# Altium PCB starfish.PcbDoc
Units mil, origin at the board's own origin, x right, y up, seen from the top; angles counter-clockwise.
Board outline 1535.43 x 1456.69 mil, 4 copper layers (Top, Route2, Route15, Bottom), stack 65.356 mil thick; 62 components, 72 nets, 276 pads, 141 vias.
Unrouted connection lines stored in the file: 10.
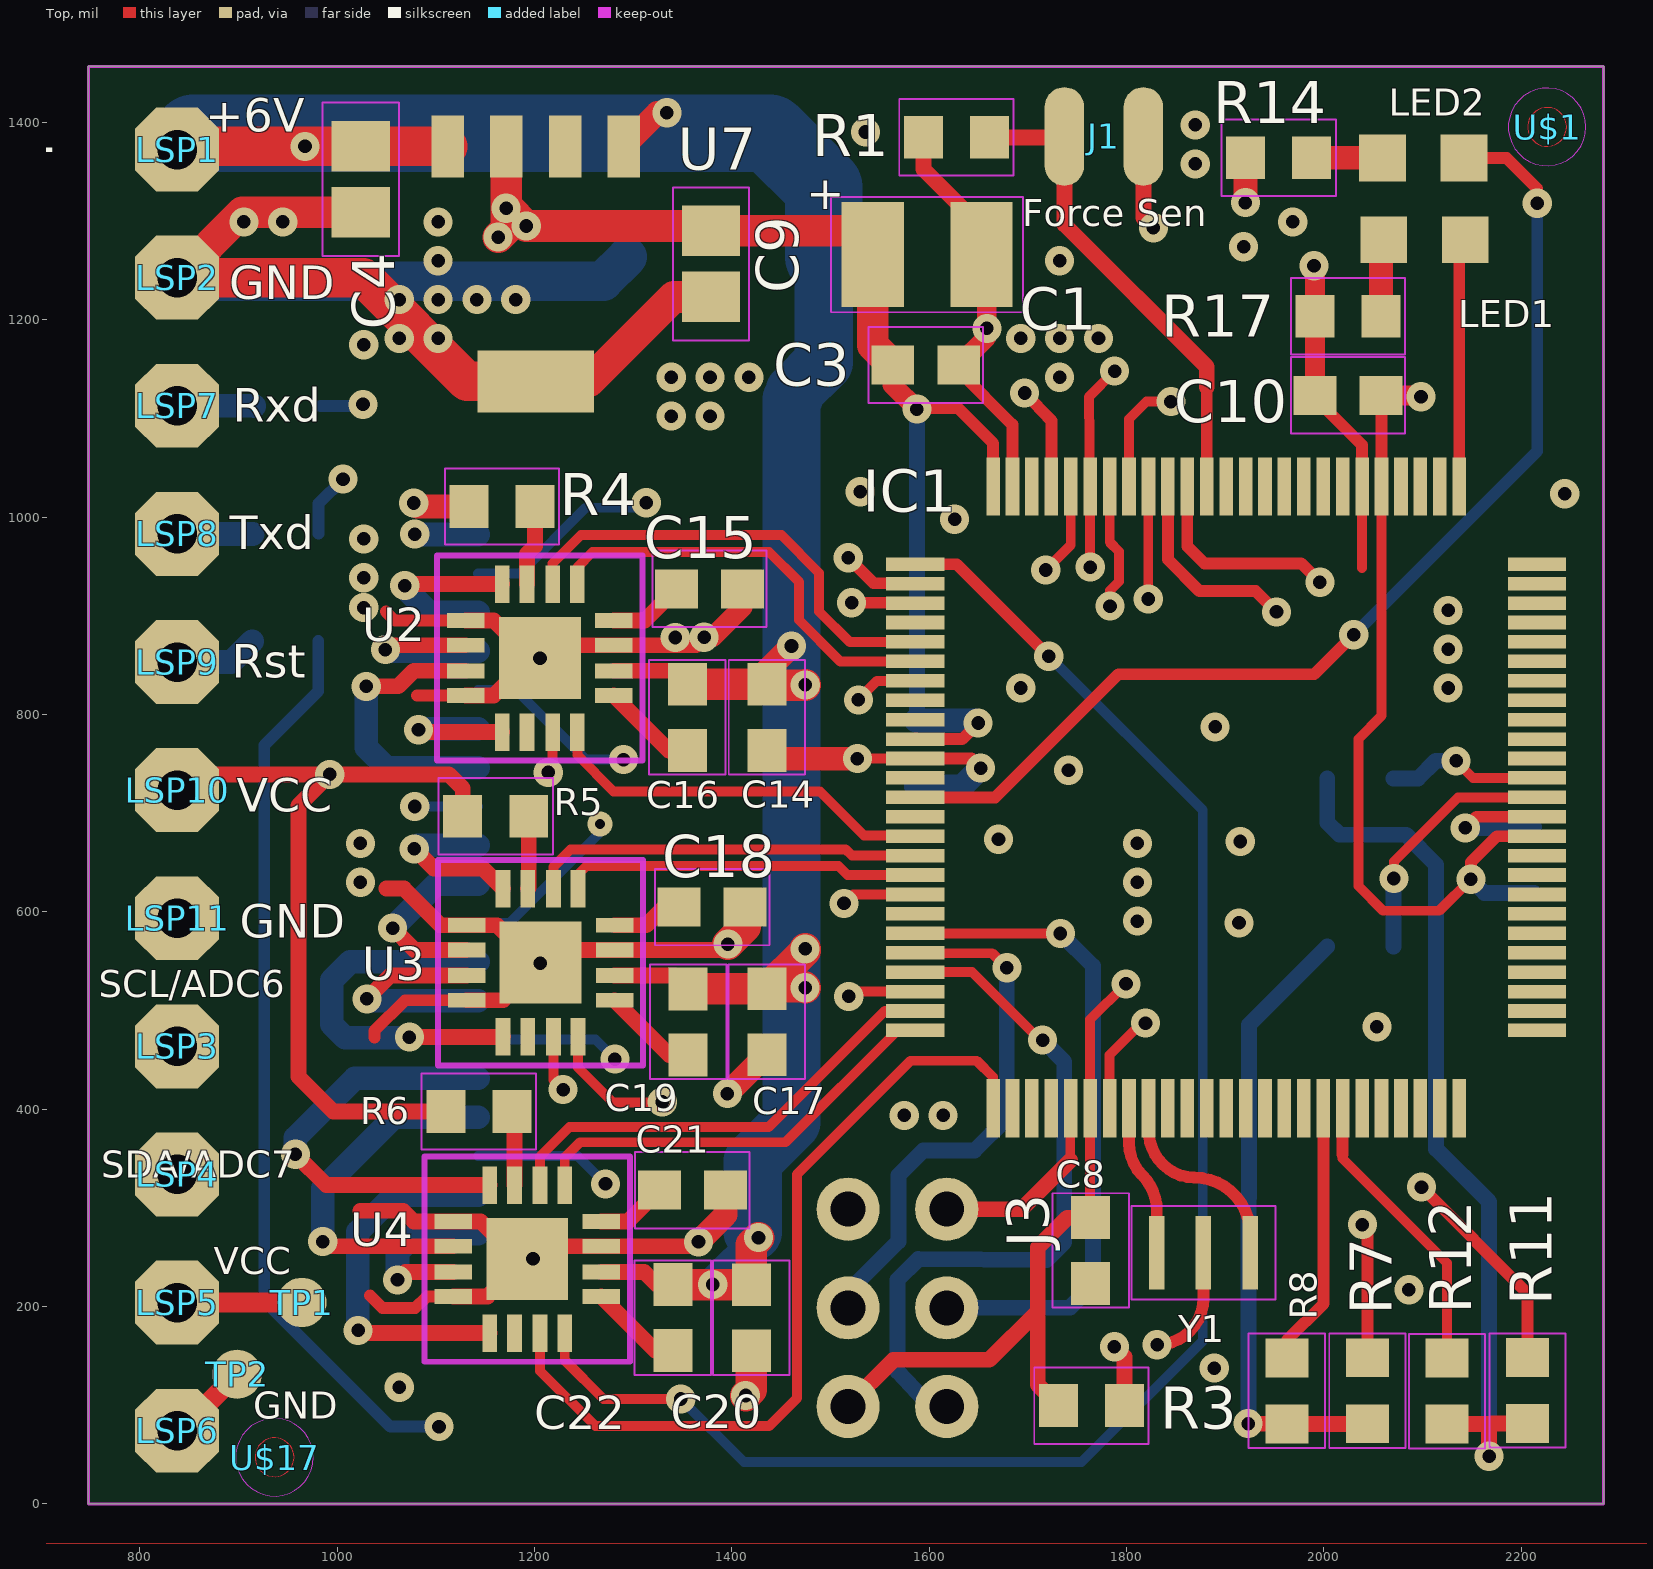
[diagram p0: Top view]
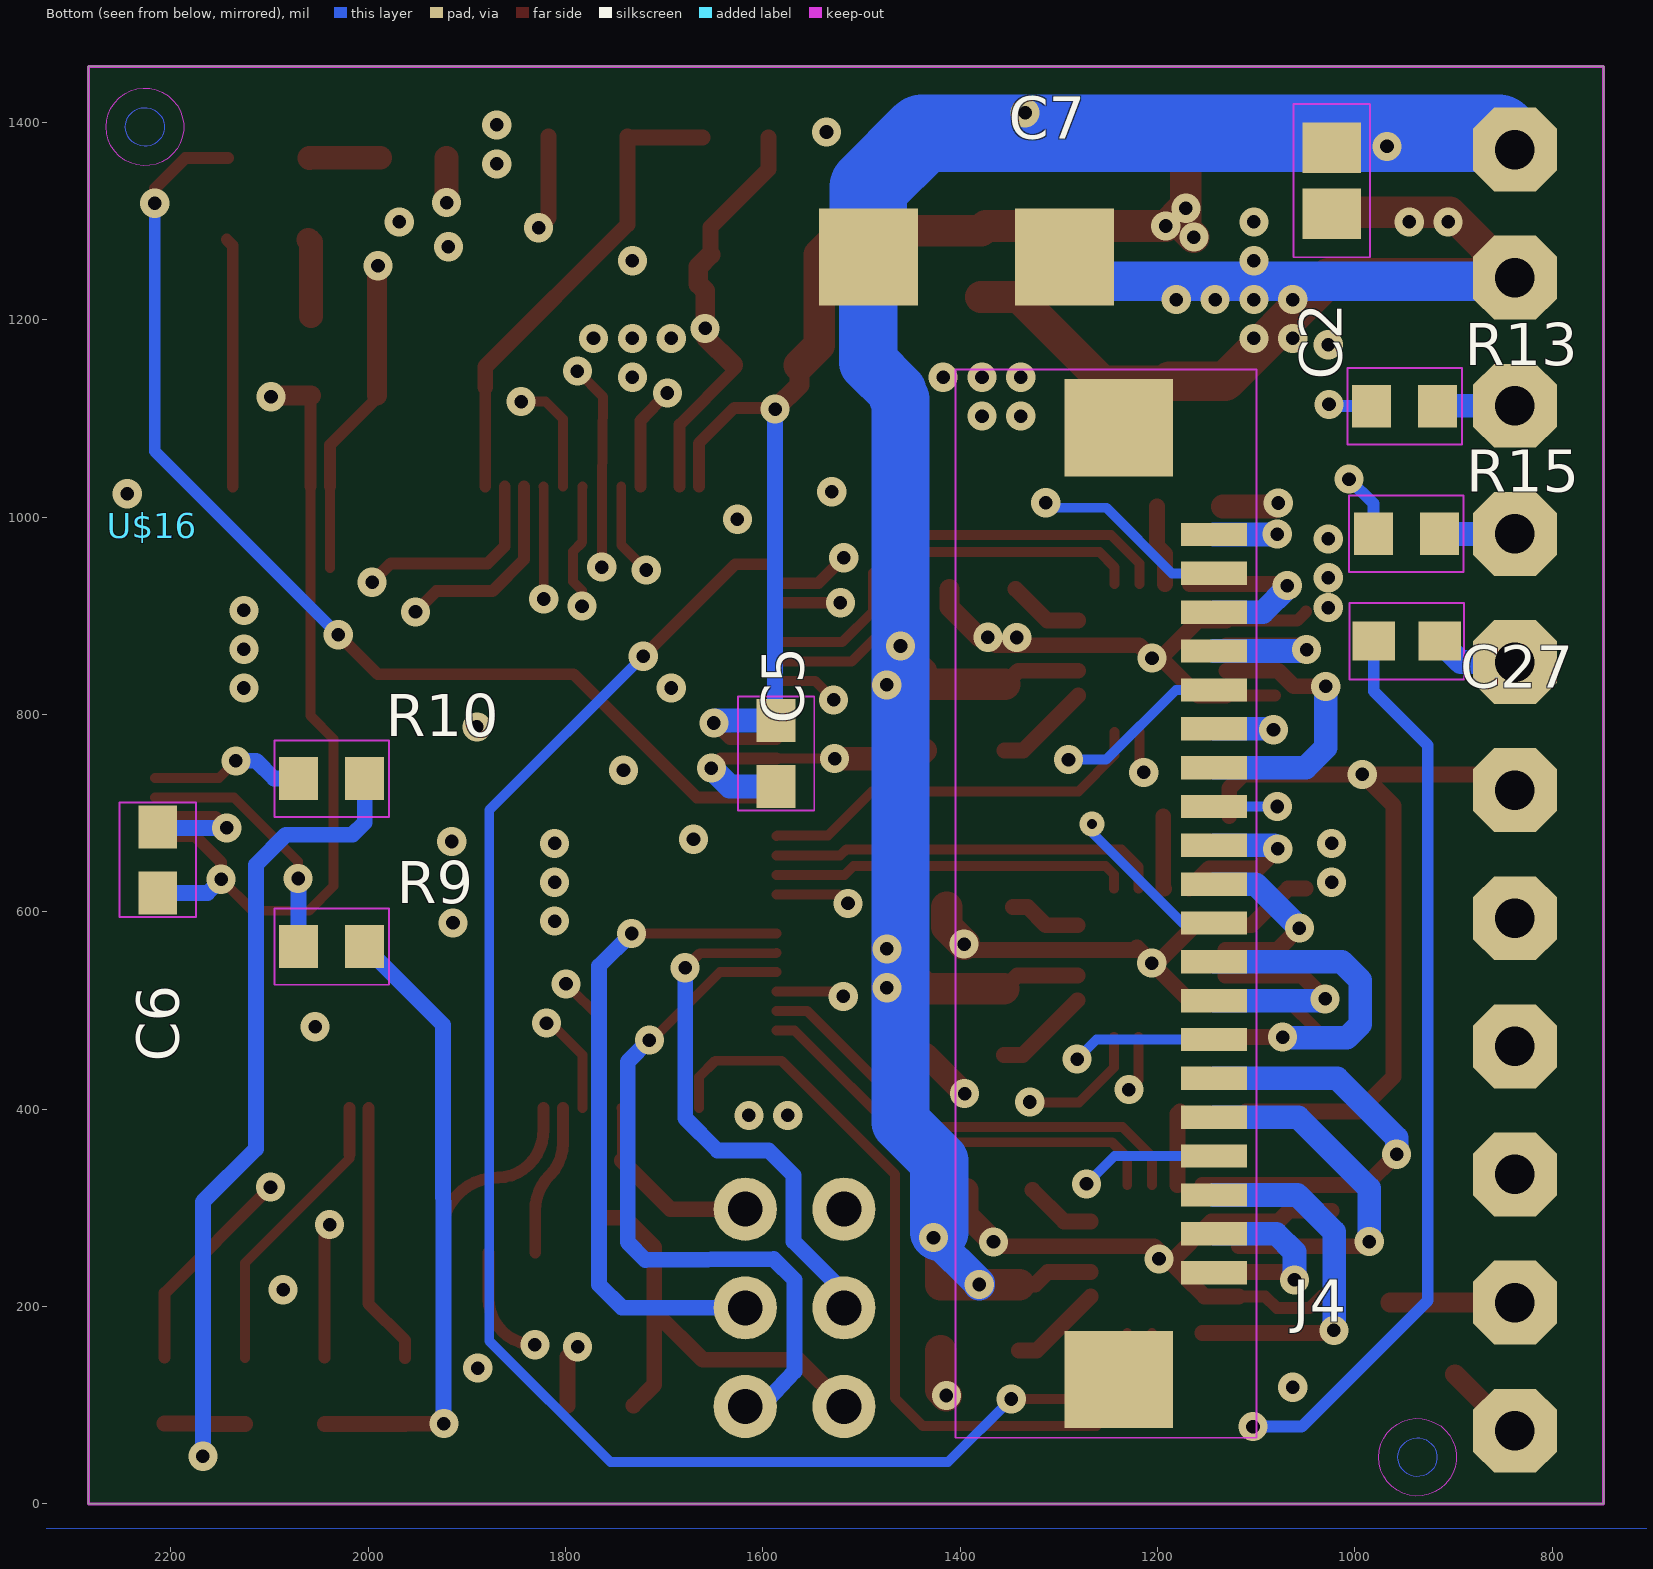
[diagram p1: Bottom view, seen from below]
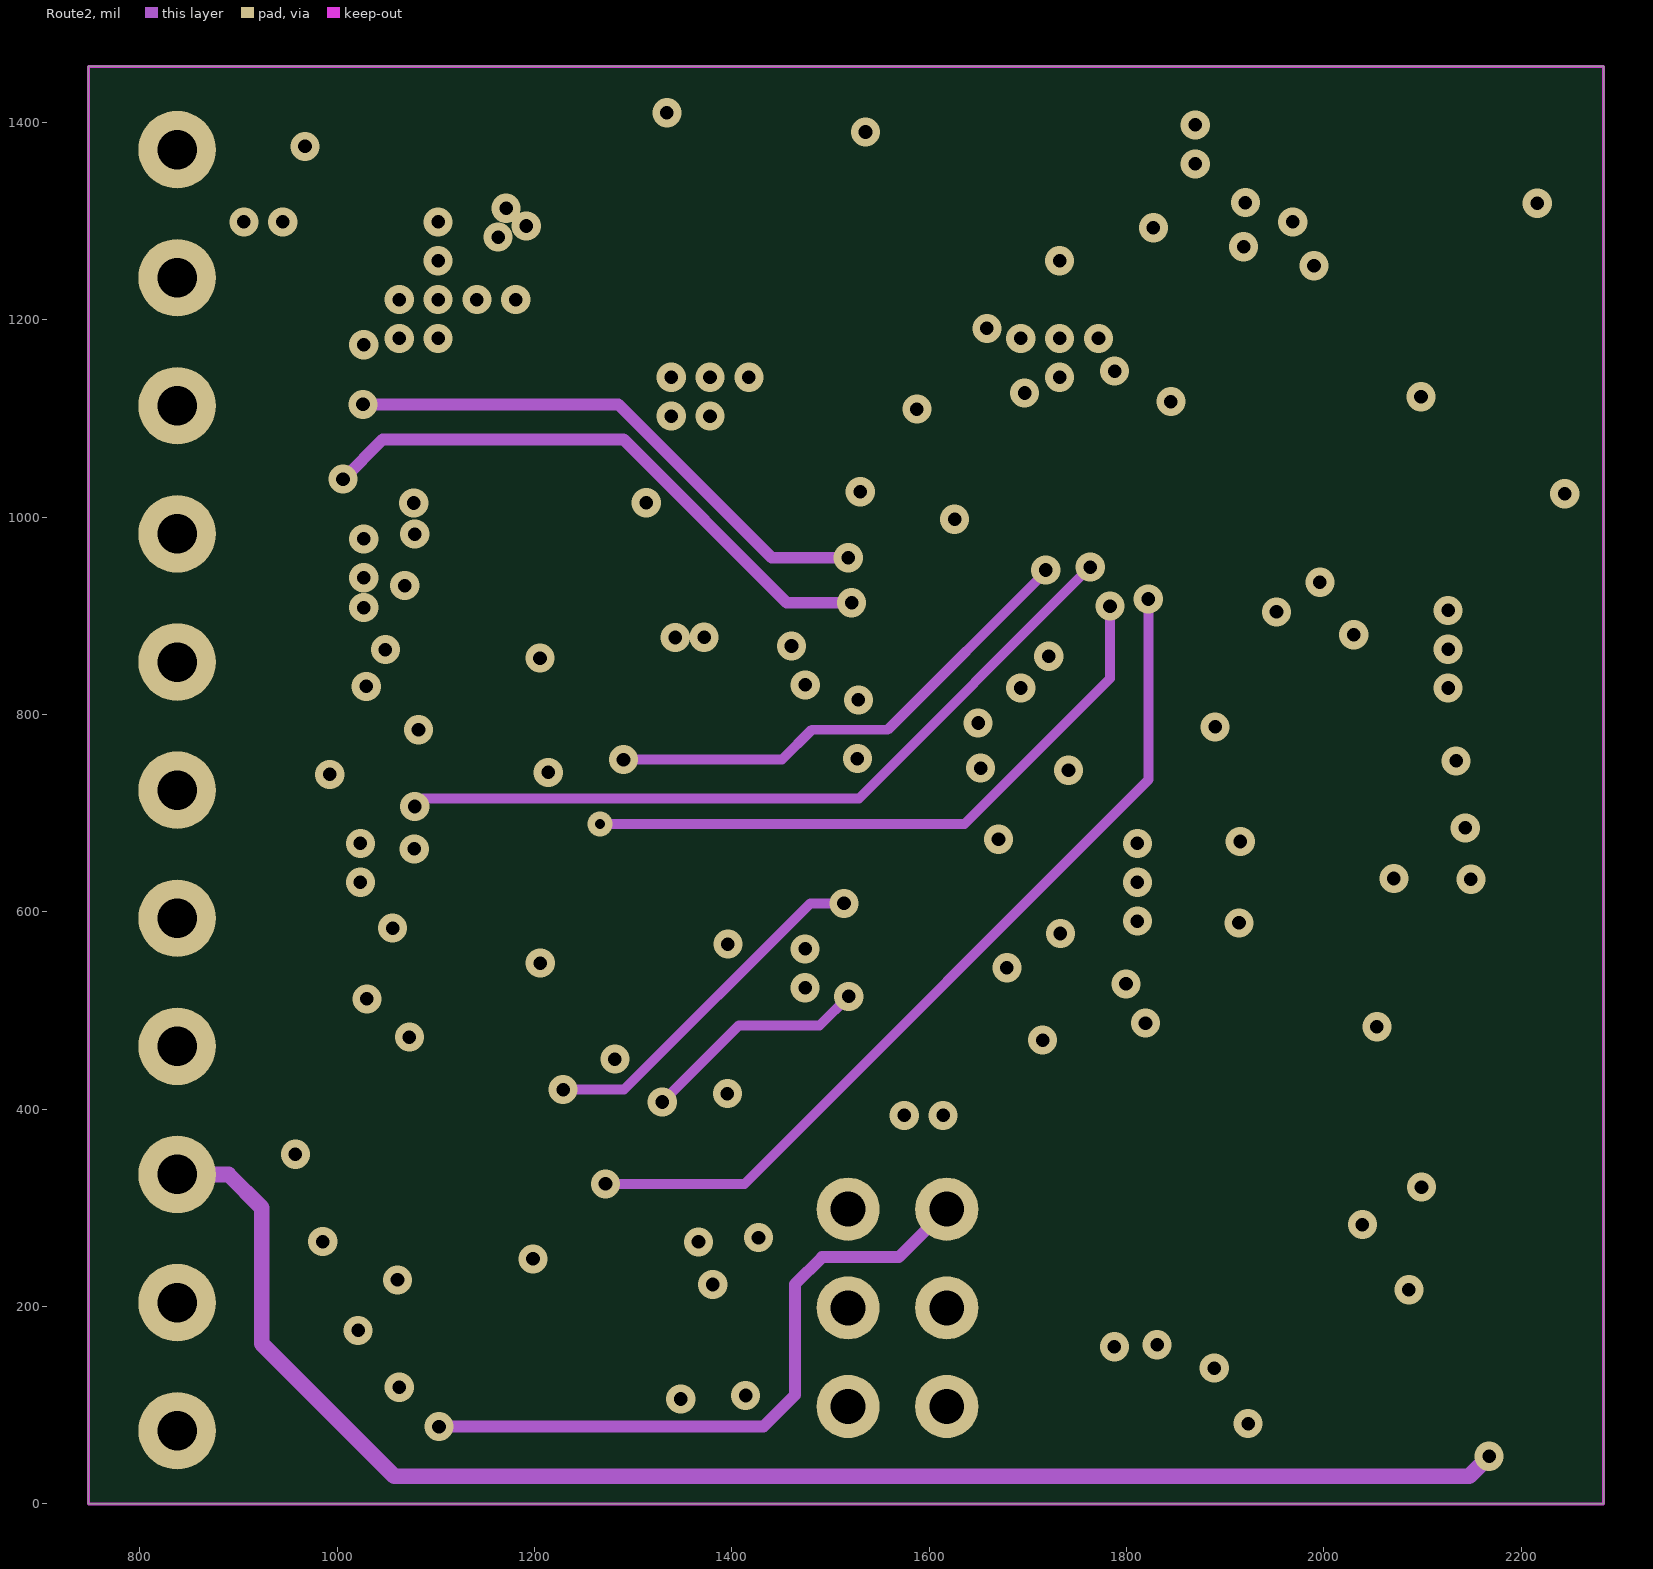
[diagram p2: Route2]
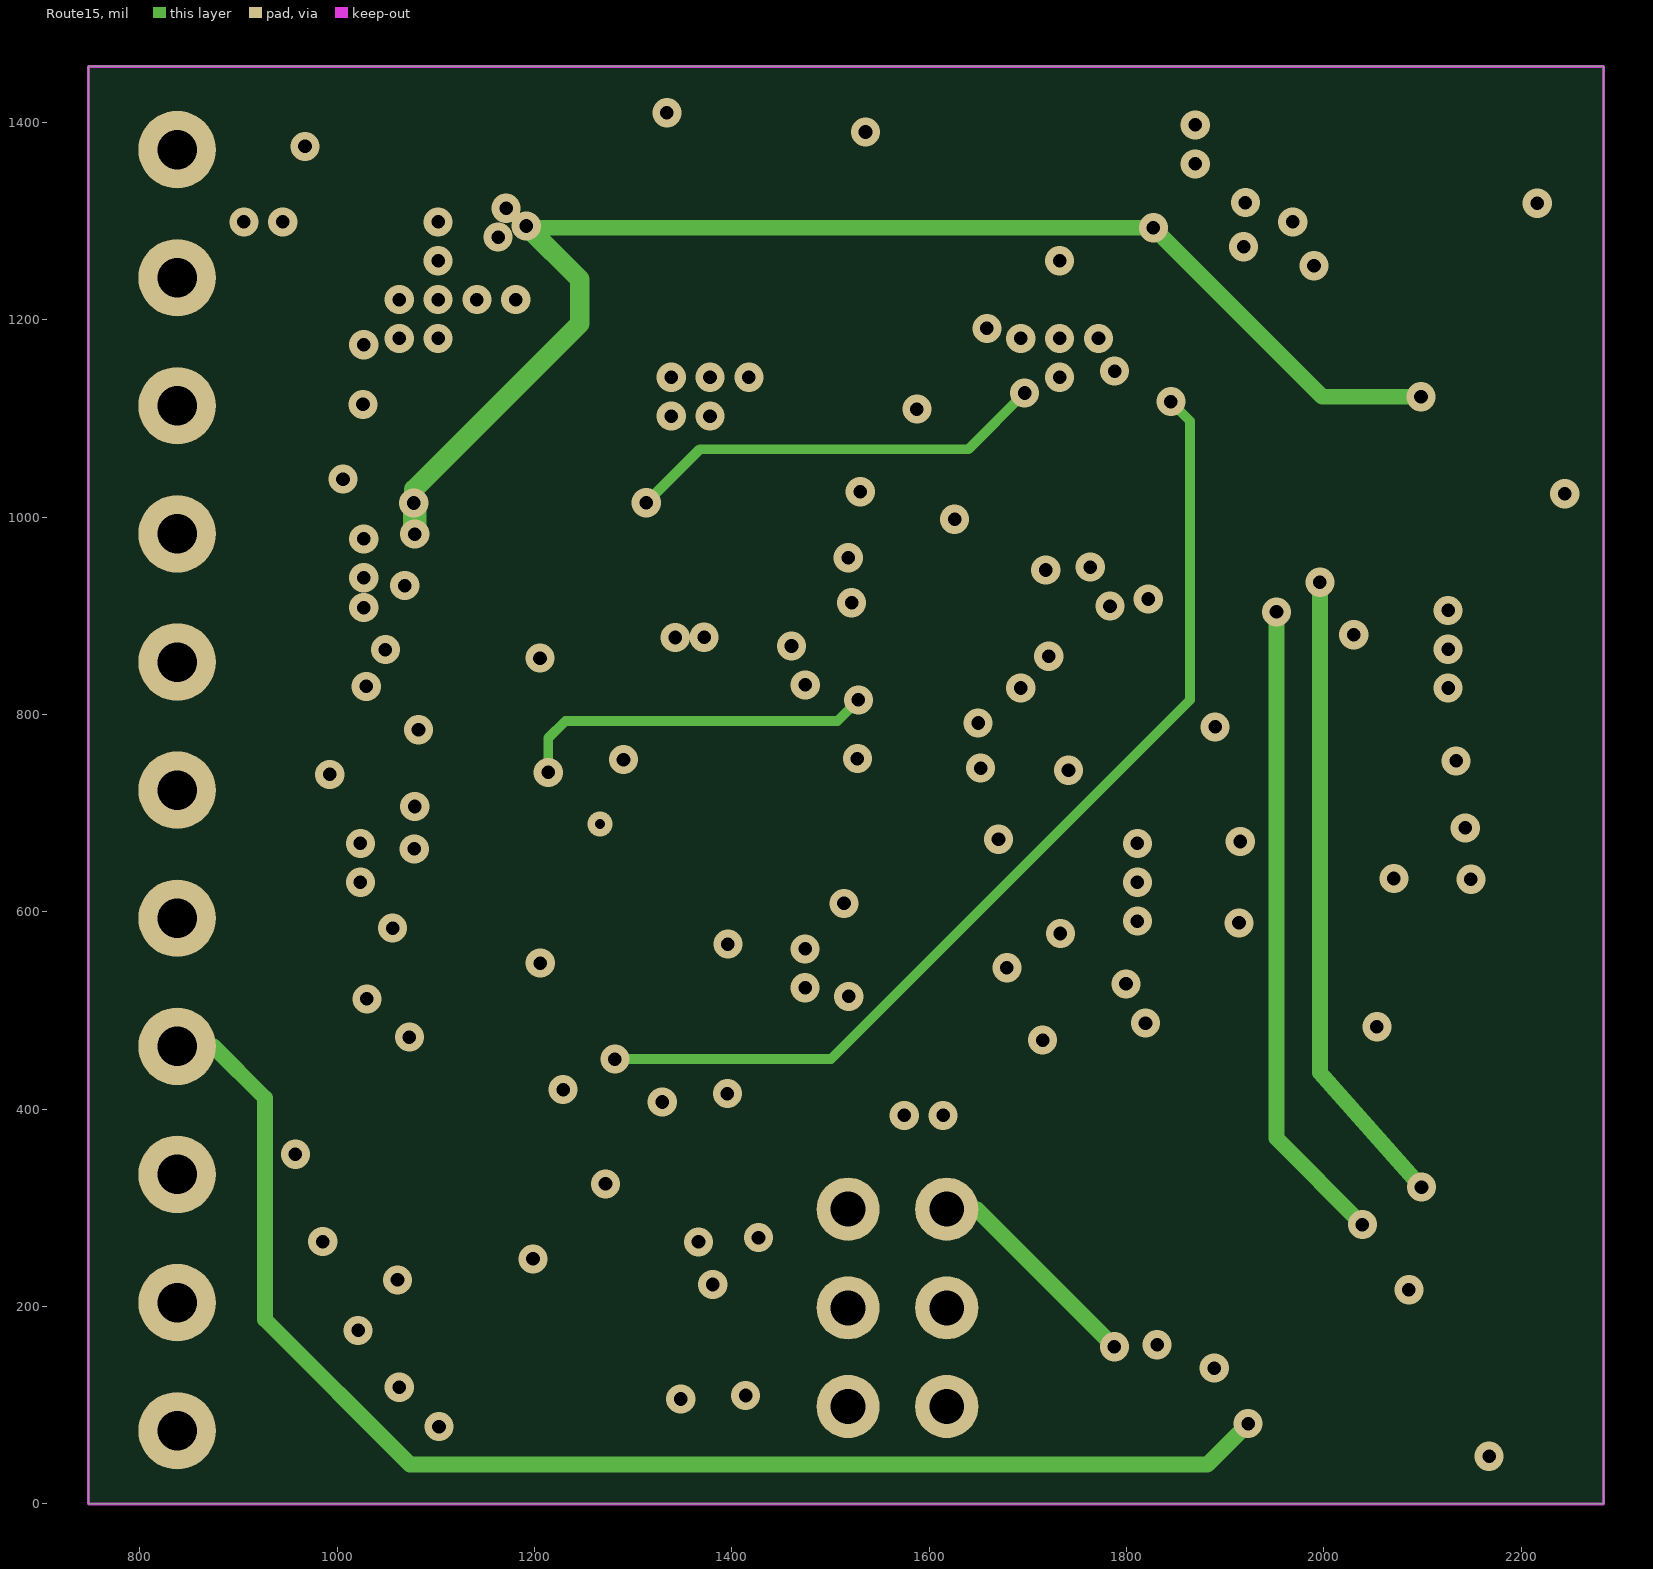
[diagram p3: Route15]

## Layer stack, top to bottom
Top Solder: solder mask 0.4, Solder Resist, Dk 3.5
Top: signal copper 1.378
Dielectric 1: core 7.874, FR-4, Dk 4.8
Route2: signal copper 1.378
Dielectric3: core 39.3701, FR-4, Dk 4.8
Route15: signal copper 1.378
Dielectric2: dielectric 12.6, FR-4, Dk 4.8
Bottom: signal copper 1.378
Bottom Solder: solder mask 0.4, Solder Resist, Dk 3.5

## Board outline
748.03,1456.69 748.03,0 2283.46,0 2283.46,1456.69

## Design rules (kind name [scope] priority, off if disabled: settings)
BoardOutlineClearance mdCopperDimension [All] p1: gap=10 ignorepadtopadclearanceinfootprint=FALSE except(0: Arc-SplitContinuation Track-SplitContinuation SMDPad-SplitContinuation THPad-SplitContinuation Via-SplitContinuation Fill-SplitContinuation Poly-SplitContinuation Region-SplitContinuation Text-SplitContinuation; 11.81: Poly-OutlineEdge Poly-CavityEdge Poly-CutoutEdge Poly-SplitBarrior)
Clearance "Clearance (Same Net)" [All] p1: gap=4.92 ignorepadtopadclearanceinfootprint=FALSE
Clearance [All] p2: gap=4.92 ignorepadtopadclearanceinfootprint=FALSE
HoleSize [All] p1: absolutevalues=TRUE maxlimit=100000 minlimit=7.87 maxpercent=80.000 minpercent=20.000
HoleToHoleClearance mdDrill [All] p1: gap=7.87 allowstackedmicrovias=TRUE
MinimumSolderMaskSliver [All] p1 off: minsoldermaskwidth=10
PasteMaskExpansion Expansion_SMDPaste_OFF [InPadClass('SMDPaste_OFF')] p1: expansion=0
PasteMaskExpansion mlMinCreamFrame [All] p2: expansion=0
PolygonConnect PolygonConnect_For_PolygonThermal_ON_Width100000_Gap78740 [InPolygonClass('PolygonThermal_ON_Width100000_Gap78740') vs Not IsVia] p1: connectstyle=Relief reliefconductorwidth=10 reliefentries=4 polygonreliefangle="90 Angle" airgapwidth=7.87
PolygonConnect PolygonConnect_For_PolygonThermal_ON_Width160000_Gap78740 [InPolygonClass('PolygonThermal_ON_Width160000_Gap78740') vs Not IsVia] p2: connectstyle=Relief reliefconductorwidth=16 reliefentries=4 polygonreliefangle="90 Angle" airgapwidth=7.87
PolygonConnect PolygonConnect_For_PolygonThermal_ON_Width240000_Gap78740 [InPolygonClass('PolygonThermal_ON_Width240000_Gap78740') vs Not IsVia] p3: connectstyle=Relief reliefconductorwidth=24 reliefentries=4 polygonreliefangle="90 Angle" airgapwidth=7.87
PolygonConnect ThermalVias [IsVia] p4: connectstyle=Direct reliefconductorwidth=10 reliefentries=4 polygonreliefangle="90 Angle" airgapwidth=10
PolygonConnect [All] p5: connectstyle=Relief reliefconductorwidth=10 reliefentries=4 polygonreliefangle="90 Angle" airgapwidth=10
RoutingVias [All] p1: holewidth=7.87 width=17.71 viastyle="Through Hole" minholewidth=7.87 minwidth=17.71 maxholewidth=100 maxwidth=100
SolderMaskExpansion mlMinStopFrame [All] p1: expansion=2.95 istentingtop=FALSE
Width [All] p1: maxlimit=10 minlimit=4.92 preferedwidth=4.92
26 further rules are at their usual default settings.

## Classes and differential pairs
polygon class PolygonThermal_ON_Width100000_Gap78740: Polygon_1_Net_GND Polygon_2_Net_GND
polygon class PolygonThermal_ON_Width160000_Gap78740: Polygon_1_Net_VCC
polygon class PolygonThermal_ON_Width240000_Gap78740: Polygon_3_Net_GND
pad class SMDPaste_OFF: J1-P$1 J1-P$2 TP1-TP TP2-TP

## Components (designator, comment, footprint, x,y, rotation, side; value= is the part's Value field where it differs from the comment)
C1 "100nF" C1210 1597.91,1265.99 r0 top
C2 "10uF" C0805 1023.59,1341.03 r270 bottom
C3 "100nF" C0603 1596.45,1154.1 r0 top
C4 "1uF" C0805 1024.07,1342.28 r270 top
C5 "100nF" C0603 1586.62,760.42 r270 bottom
C6 "100nF" C0603 2213.26,652.57 r90 bottom
C7 "47u/16V Tantlum" C/6032-28R 1393.7,1263.78 r0 bottom
C8 "100nF" C0603 1763.63,256.77 r270 top
C9 "1uF" C0805 1378.95,1256.53 r270 top
C10 "100nF" C0603 2024.49,1123.31 r180 top
C14 "100nF" C0603 1435.63,797.01 r270 top
C15 "2.2uF" C0603 1377.4,927.24 r0 top
C16 "10nF" C0603 1354.98,797.01 r270 top
C17 "100nF" C0603 1435.54,488.51 r270 top
C18 "2.2uF" C0603 1379.99,604.79 r0 top
C19 "10nF" C0603 1355.7,488.41 r270 top
C20 "100nF" C0603 1419.88,188.53 r270 top
C21 "2.2uF" C0603 1360.11,317.97 r0 top
C22 "10nF" C0603 1340.29,188.78 r270 top
C27 "100nF" C0603 947.5,874.27 r0 bottom
IC1 "ATMEGA2560-16AU" TQFP100 1901,716 r0 top
J1 "" SOLDER_PAD_2 1777.13,1385.77 r0 top
J3 "" AVRISP 1567.85,198.62 r180 top
J4 "FFC3B07-20-T" GCT_FFC3B07-20-T 1239.33,608.33 r270 bottom
LED1 "" CHIPLED_0805 2101.9,1281.18 r90 top
LED2 "" CHIPLED_0805 2100.76,1363.88 r90 top
LSP1 "LSP10" LSP10 837.85,1372.46 r0 top
LSP2 "LSP10" LSP10 837.85,1242.63 r0 top
LSP3 "LSP10" LSP10 837.85,463.62 r0 top
LSP4 "LSP10" LSP10 837.85,333.79 r0 top
LSP5 "LSP10" LSP10 837.85,203.95 r0 top
LSP6 "LSP10" LSP10 837.85,74.12 r0 top
LSP7 "LSP10" LSP10 837.85,1112.79 r0 top
LSP8 "LSP10" LSP10 837.85,982.96 r0 top
LSP9 "LSP10" LSP10 837.85,853.13 r0 top
LSP10 "LSP10" LSP10 837.85,723.29 r0 top
LSP11 "LSP10" LSP10 837.85,593.46 r0 top
R1 "3k3" R0603 1627.71,1384.83 r0 top
R3 "10K" R0603 1764.51,99.57 r180 top
R4 "10K" R0603 1167.11,1010.74 r0 top
R5 "10K" R0603 1160.71,696.77 r0 top
R6 "10K" R0603 1143.69,397.62 r0 top
R7 "10K" R0603 2044.18,114.65 r270 top
R8 "0R" R0603 1962.58,114.51 r270 top
R9 "DNF" R0603 2037,564.76 r180 bottom
R10 "DNF" R0603 2037,735 r180 bottom
R11 "10K" R0603 2206.36,114.87 r270 top
R12 "0R" R0603 2124.77,114.23 r270 top
R13 "1K" R0603 949.62,1112.45 r180 bottom
R14 "1K" R0603 1954.14,1364.16 r0 top
R15 "1K" R0603 947.86,983.14 r180 bottom
R17 "1K" R0603 2024.49,1203.5 r0 top
TP1 "vcc" B1,27 964.25,204.03 r0 top
TP2 "gnd" B1,27 898.62,131.3 r0 top
U2 "DRV8833RTYT" QFN65P400X400X80-17N 1205.46,857.18 r0 top
U3 "DRV8833RTYT" QFN65P400X400X80-17N 1206.21,548.42 r0 top
U4 "DRV8833RTYT" QFN65P400X400X80-17N 1192.71,248.04 r0 top
U7 "LP38692MP-5.0" SOT150P696X180-5N 1201.31,1256.53 r270 top
U$1 "" CIRCLE-1MM-2R 2226.26,1395.39 r0 top
U$16 "" ADSTRUM_LOGO 2218.87,991.61 r180 bottom
U$17 "" CIRCLE-1MM-2R 936.64,47.26 r0 top
Y1 "CSTNE16M0VH3C000R0" OSC_CSTNE16M0VH3C000R0 1877.98,254.55 r180 top

## Footprints (in the part's own frame and the unit in brackets; to place one, negate y for a bottom-side part, rotate by r counter-clockwise, add the part's x,y. Pads: shape width x height; smd on the part's side, far side on the other; paste and mask are expansions set on the pad)
ADSTRUM_LOGO [mil] "ADSTRUM_LOGO"
AVRISP [mil] "AVRISP"
  round 64 hole 35.43: 1(-50,100) 2(50,100) 3(-50,0) 4(50,0) 5(-50,-100) 6(50,-100)
  body extent -82,-132 82,132, height 50
B1,27 [mil] "B1,27"
  rrect100% 50x50 smd paste+0: TP(0,0)
  body extent -25,-25 25,25, height 50
C0603 [mm] "C0603"
  rect 1.1x1 smd: 1(-0.85,0) 2(0.85,0)
  Top keep-out lines w0.051: -1.473,-0.983 -1.473,0.983 1.473,0.983 1.473,-0.983 -1.473,-0.983
  body extent -1.5,-1.01 1.5,1.01, height 3.81
C0805 [mil] "C0805"
  rect 51.18x59.06 smd: 1(-33.46,0) 2(33.46,0)
  Top keep-out lines w2: 77.68,38.7 77.68,-38.7 -77.68,-38.7 -77.68,38.7 77.68,38.7
  body extent -79,-40 79,40, height 150
C1210 [mil] "C1210"
  rect 62.99x106.3 smd: 1(-55.12,0) 2(55.12,0)
  Top keep-out lines w2: -97.36,-58.39 -97.36,58.39 97.36,58.39 97.36,-58.39 -97.36,-58.39
  body extent -98,-59 98,59, height 150
C/6032-28R [mm] "C/6032-28R"
  rect 2.55x2.5 smd: +(2.525,0) -(-2.525,0)
  body extent -3.8,-1.25 3.8,1.25, height 1.27
CHIPLED_0805 [mil] "CHIPLED_0805"
  rect 47.24x47.24 smd: A(0,-41.34) C(0,41.34)
  body extent -25,-65 25,65, height 150
CIRCLE-1MM-2R [mil] "CIRCLE-1MM-2R"
  Top circle w0: c0,0 r19.69
  Top keep-out circle w0: c0,0 r39.37
  Bottom circle w0: c0,0 r19.69
  Bottom keep-out circle w0: c0,0 r39.37
  body extent -40,-40 40,40, height 150
GCT_FFC3B07-20-T [mil] "GCT_FFC3B07-20-T"
  rect 23.62x66.93 smd: 1(374.02,96.46) 2(334.65,96.46) 3(295.28,96.46) 4(255.91,96.46) 5(216.54,96.46) 6(177.17,96.46) 7(137.8,96.46) 8(98.43,96.46) 9(59.06,96.46) 10(19.69,96.46) 11(-19.69,96.46) 12(-59.06,96.46) 13(-98.43,96.46) 14(-137.8,96.46) 15(-177.17,96.46) 16(-216.54,96.46) 17(-255.91,96.46) 18(-295.28,96.46) 19(-334.65,96.46) 20(-374.02,96.46)
  rect 98.43x110.24 smd: S1(482.28,0) S2(-482.28,0)
  Top keep-out lines w1.97: 541.34,139.76 -541.34,139.76 -541.34,-165.35 541.34,-165.35 541.34,139.76
  body extent -542,-166 542,141, height 150
LSP10 [mil] "LSP10"
  oct 85x85 / inner round 78.53 / far side oct 85x85 hole 40: MP(0,0)
  body extent -48,-40 48,40, height 150
OSC_CSTNE16M0VH3C000R0 [mil] "OSC_CSTNE16M0VH3C000R0"
  rect 15.75x74.8 smd: 1(-47.24,0) 2(0,0) 3(47.24,0)
  Top keep-out lines w1.97: 72.83,47.24 72.83,-47.24 -72.83,-47.24 -72.83,47.24 72.83,47.24
  body extent -95,-48 74,48, height 150
QFN65P400X400X80-17N [mil] "QFN65P400X400X80-17N"
  rect 38x15 smd: 1(-75,38) 2(-75,13) 3(-75,-13) 4(-75,-38) 9(75,-38) 10(75,-13) 11(75,13) 12(75,38)
  rect 15x38 smd: 5(-38,-75) 6(-13,-75) 7(13,-75) 8(38,-75) 13(38,75) 14(13,75) 15(-13,75) 16(-38,75)
  rect 83x83 smd: 17(0,0)
  Top keep-out lines w6: -104,-104 104,-104 104,104 -104,104 -104,-104
  body extent -107,-107 107,107, height 150
R0603 [mm] "R0603"
  rect 1x1.1 smd: 1(-0.85,0) 2(0.85,0)
  Top keep-out lines w0.051: -1.473,-0.983 -1.473,0.983 1.473,0.983 1.473,-0.983 -1.473,-0.983
  body extent -1.5,-1.01 1.5,1.01, height 3.81
SOLDER_PAD_2 [mil] "SOLDER_PAD_2"
  rrect100% 40x100 smd paste+0: P$1(-40,0) P$2(40,0)
  body extent -60,-50 60,50, height 50
SOT150P696X180-5N [mil] "SOT150P696X180-5N"
  rect 63x33 smd: 1(-119,89) 2(-119,30) 3(-119,-30) 4(-119,-89)
  rect 63x118 smd: 5(119,0)
  body extent -151,-131 150,131, height 150
TQFP100 [mm] "TQFP100"
  rect 1.5x0.35 smd: 1(-8,6) 2(-8,5.5) 3(-8,5) 4(-8,4.5) 5(-8,4) 6(-8,3.5) 7(-8,3) 8(-8,2.5) 9(-8,2) 10(-8,1.5) 11(-8,1) 12(-8,0.5) 13(-8,0) 14(-8,-0.5) 15(-8,-1) 16(-8,-1.5) 17(-8,-2) 18(-8,-2.5) 19(-8,-3) 20(-8,-3.5) 21(-8,-4) 22(-8,-4.5) 23(-8,-5) 24(-8,-5.5) 25(-8,-6) 51(8,-6) 52(8,-5.5) 53(8,-5) 54(8,-4.5) 55(8,-4) 56(8,-3.5) 57(8,-3) 58(8,-2.5) 59(8,-2) 60(8,-1.5) 61(8,-1) 62(8,-0.5) 63(8,0) 64(8,0.5) 65(8,1) 66(8,1.5) 67(8,2) 68(8,2.5) 69(8,3) 70(8,3.5) 71(8,4) 72(8,4.5) 73(8,5) 74(8,5.5) 75(8,6)
  rect 0.35x1.5 smd: 26(-6,-8) 27(-5.5,-8) 28(-5,-8) 29(-4.5,-8) 30(-4,-8) 31(-3.5,-8) 32(-3,-8) 33(-2.5,-8) 34(-2,-8) 35(-1.5,-8) 36(-1,-8) 37(-0.5,-8) 38(0,-8) 39(0.5,-8) 40(1,-8) 41(1.5,-8) 42(2,-8) 43(2.5,-8) 44(3,-8) 45(3.5,-8) 46(4,-8) 47(4.5,-8) 48(5,-8) 49(5.5,-8) 50(6,-8) 76(6,8) 77(5.5,8) 78(5,8) 79(4.5,8) 80(4,8) 81(3.5,8) 82(3,8) 83(2.5,8) 84(2,8) 85(1.5,8) 86(1,8) 87(0.5,8) 88(0,8) 89(-0.5,8) 90(-1,8) 91(-1.5,8) 92(-2,8) 93(-2.5,8) 94(-3,8) 95(-3.5,8) 96(-4,8) 97(-4.5,8) 98(-5,8) 99(-5.5,8) 100(-6,8)
  body extent -8.75,-8.75 8.75,8.75, height 3.81

## Part data
C1: library part C1210, PackageName=C1210
C2 C4 C9: library part C0805, PackageName=C0805
C3 C5 C6 C8 C10 C14 C15 C16 C17 C18 C19 C20 C21 C22 C27: library part C0603, PackageName=C0603
C7: library part C/6032-28R, PackageName=C/6032-28R
IC1: library part TQFP100, PackageName=TQFP100
J1: library part SOLDER_PAD_2, PackageName=SOLDER_PAD_2
J3: library part AVRISP, PackageName=AVRISP
J4: library part GCT_FFC3B07-20-T, PackageName=GCT_FFC3B07-20-T
LED1 LED2: library part CHIPLED_0805, PackageName=CHIPLED_0805
R1 R3 R4 R5 R6 R7 R8 R9 R10 R11 R12 R13 R14 R15 R17: library part R0603, PackageName=R0603
TP1 TP2: library part B1,27, PackageName=B1,27
U2 U3 U4: library part QFN65P400X400X80-17N, PackageName=QFN65P400X400X80-17N
U7: library part SOT150P696X180-5N, PackageName=SOT150P696X180-5N
U$1 U$17: library part CIRCLE-1MM-2R, PackageName=CIRCLE-1MM-2R
U$16: library part ADSTRUM_LOGO, PackageName=ADSTRUM_LOGO
Y1: library part OSC_CSTNE16M0VH3C000R0, PackageName=OSC_CSTNE16M0VH3C000R0
LSP1 LSP2 LSP3 LSP4 LSP5 LSP6 LSP7 LSP8 LSP9 LSP10 LSP11: PackageName=LSP10

## Via types
v1: diameter 29.53/29.53/29.53/29.53 (per signal layer), hole 13.78, Top to Bottom, 140 vias
v2: diameter 25.59/25.59/25.59/25.59 (per signal layer), hole 9.84, Top to Bottom, 1 vias

## Nets (pads, with @x,y where several pads share a name; then routed paths per layer and width w, separated by ;. In a path a pad name is that pad's centre, name@x,y a point inside that pad or via, vN(x,y) a via of type N, cw(c..) or ccw(c..) an arc to the next point about the centre after c; other vN are vias at no path point)
22_BREAKOUT: IC1.78
23_BREAKOUT: IC1.77
+6V: C2.1 C4.1 C7.+ C14.1 C16.1 C17.1 C19.1 C20.1 C22.1 LSP1.MP U2.10 U3.10 U4.10 U7.1 U7.4 | length 3054.6
  Top w16: U4.10 1311.25,235.04 1324.04,222.24 C22.1 ; U2.10 1341.28,844.18 C16.1 ; U3.10 1342.16,535.42 C19.1
  Top w24: U7.1 1324.53,1409.75 v1(1334.25,1409.75) ; C14.1 1435.63,844.52 v1(1460.5,869.39)
  Top w32: C22.1 v1(1380.75,222.24) 1419.63,222.24 C20.1 1419.88,262.52 v1(1427.1,269.74) ; C16.1 C14.1 1446.27,830.48 1447,829.75 1474.25,829.75 v1(1474.5,830) ; C19.1 1355.81,521.97 C17.1 ; v1(1474.31,522.98) 1473.31,523.98 1437.54,523.98 C17.1 ; v1(1474.31,562.35) 1474.31,560.74 C17.1
  Top w40: LSP1.MP 841.13,1375.74 v1(967.5,1375.74) C4.1 1112.09,1375.74 U7.4
  Bottom w20: 1460.5,551.18 1460.5,536.79 v1(1474.31,522.98) ; v1(1460.5,869.39) 1460.5,844 v1(1474.5,830)
  Bottom w24: v1(1334.25,1409.75) 1338.58,1405.42 1338.58,1389
  Bottom w32: v1(1380.75,222.24) 1380.75,223.39 v1(1427.1,269.74) v1@1421.25,275.59
  Bottom w40: v1(967.5,1375.74) 968.75,1374.49 C2.1
  Bottom w59.06: v1@1421.25,275.59 1421.25,347.5 1460.5,386.75 1460.5,551.18 v1(1460.5,869.39) 1460.5,1119.49 1463.58,1122.57 1463.58,1127.33 1493.11,1156.86 C7.+
  Bottom w78.74: LSP1.MP 854.39,1389 1338.58,1389 1438.5,1389 1493.11,1334.39 C7.+
A1_M1: J4.18 U2.16 | length 186.3
  Top w16: v1(1068.5,930.5) 1070.18,932.18 U2.16
  Bottom w24: v1(1068.5,930.5) 1068.5,928.48 1093.37,903.61 J4.18
A1_M3: J4.12 U3.16 | length 172.8
  Top w16: v1(1078.25,663.75) 1098,644 1147.63,644 U3.16
  Bottom w24: v1(1078.25,663.75) 1081.89,667.39 J4.12
A1_M5: J4.6 U4.16 | length 436.7
  Top w16: v1(957.75,354.25) 988.96,323.04 U4.16
  Bottom w24: v1(957.75,354.25) 957.75,371 1017.92,431.17 J4.6
A2_M1: J4.17 U2.2 | length 177.8
  Top w16: v1(1049,865.75) 1053.43,870.18 U2.2
  Bottom w24: v1(1049,865.75) 1050.51,864.24 J4.17
A2_M3: J4.11 U3.2 | length 189.2
  Top w16: v1(1056.25,583.5) 1078.33,561.42 U3.2
  Bottom w24: v1(1056.25,583.5) 1100.77,628.02 J4.11
A2_M5: J4.5 U4.2 | length 375.4
  Top w16: v1(985.5,265.75) 990.21,261.04 U4.2
  Bottom w24: v1(985.5,265.75) 985.5,319.75 1057.55,391.8 J4.5
ADC8_BREAKOUT: IC1.89 J1.P$1 R1.2 | length 490.9
  Top w12: IC1.89 1881.32,1131.69
  Top w16: R1.2 1736.19,1384.83 J1.P$1 1737.13,1296.62 1881.32,1152.44 1881.32,1131.69
ADC9_BREAKOUT: IC1.88
B1_M2: J4.15 U2.5 | length 146.7
  Top w16: v1(1082.5,784.5) 1084.82,782.18 U2.5
  Bottom w24: v1(1082.5,784.5) 1083.5,785.5 J4.15
B1_M4: J4.9 U3.5 | length 380.4
  Top w16: v1(1073.25,473) 1167.79,473 U3.5
  Bottom w24: v1(1073.25,473) 1072.63,472.38 1008.13,472.38 994.5,486 994.5,530.5 1013.28,549.28 J4.9
B1_M6: J4.3 U4.5 | length 372
  Top w16: v1(1021.25,175.75) 1023.96,173.04 U4.5
  Bottom w24: v1(1021.25,175.75) 1021,176 1021,275.75 1058.31,313.06 J4.3@1142.87,313.06
B2_M2: J4.14 U2.3 | length 291.3
  Top w16: v1(1029.5,828.5) 1062,828.5 1077.68,844.18 U2.3
  Bottom w24: v1(1029.5,828.5) 1029.5,766.5 1049.87,746.13 J4.14
B2_M4: J4.8 U3.3 | length 224.1
  Top w16: v1(1030.25,511.75) 1053.92,535.42 U3.3
  Bottom w24: v1(1030.25,511.75) 1032.09,509.91 J4.8
B2_M6: J4.2 U4.3 | length 177.3
  Top w16: v1(1061.25,227) 1069.29,235.04 U4.3
  Bottom w24: v1(1061.25,227) 1061.25,255.25 1079.69,273.69 J4.2
GND: C1.2 C2.2 C3.2 C4.2 C5.2 C6.2 C7.- C8.2 C9.2 C10.2 C14.2 C15.2 C17.2 C18.2 C20.2 C21.2 IC1.11 IC1.32 IC1.62 IC1.81 IC1.99 J3.6 J4.1 J4.S1 J4.S2 LSP2.MP LSP6.MP LSP11.MP R1.1 R14.1 R17.1 TP2.TP U2.1 U2.4 U2.11 U2.17 U3.1 U3.4 U3.11 U3.17 U4.1 U4.4 U4.11 U4.17 U7.5 Y1.2 | length 4774.5
  Top w10: v1(1527.25,755.25) 1527.37,755.37 IC1.11 ; IC1.99 IC1.99@1685,1031.5 ; IC1.32 1782.89,454.89 1815.25,487.25 v1(1819.25,487.25) ; 2038.8,948.34 IC1.81
  Top w12: 1033.5,211 1046,198.5 1079.25,198.5 1090.79,210.04 U4.4 ; 1037.75,472.5 1037.75,479.25 1068.92,510.42 U3.4 U3.4@1130.58,510.42 ; 1049.5,904.25 1058.57,895.18 U2.1 ; 1080.93,819.18 U2.4 ; U3.1@1127.33,586.42 U3.1 ; IC1.11 1642.88,755.37 1652.11,746.14 v1(1652.11,745.6) ; C3.2 1629.91,1148.34 1684.46,1093.79 IC1.99 ; v1(1831,161.25) ccw(c1831,208.23) 1877.98,208.23 Y1.2 ; C10.2 1991.02,1120.73 2038.8,1072.95 IC1.81 ; v1(2143.25,685) 2154.57,696.32 IC1.62
  Top w16: 1023.5,297 1066.75,297 1077.71,286.04 U4.1 1145.46,286.04 U4.17@1186.75,244.75 ; 1050,623.5 1067.75,623.5 1104.83,586.42 U3.1 1162.08,586.42 U3.17@1203.15,545.35 ; U4.4 1152.29,210.04 1173,230.75 1173,231 U4.17@1186.75,244.75 ; U2.4 1158.82,819.18 U2.17@1193.44,853.8 ; U2.1 1158.82,895.18 U2.17@1196.82,857.18 ; U3.4 1168.21,510.42 U3.17@1203.15,545.35 ; U4.17 U4.17@1190.5,248.04 ; v1(1366.25,265.5) 1361.79,261.04 U4.11 1203.5,261.04 U4.17@1190.5,248.04 ; v1(1372,878.25) 1363.93,870.18 U2.11 1218.46,870.18 U2.17 ; v1(1396,567.25) 1390.17,561.42 U3.11 1223.33,561.42 1220.75,564 1206.21,549.46 U3.17 U3.17@1203.15,545.35 ; R1.1 1594.25,1352.5 1653.03,1293.72 C1.2 ; U4.17@1186.75,244.75 1190.04,248.04 U4.17@1190.5,248.04 ; U2.17@1193.44,853.8 1202.08,853.8 U2.17 ; U2.17@1193.44,853.8 U2.17@1196.82,857.18 ; U2.17@1196.82,857.18 U2.17
  Top w20: LSP6.MP 841.44,74.12 TP2.TP ; v1(1372,878.25) 1380.5,878.25 1410.86,908.61 C15.2 ; C3.2 1658.5,1182.69 v1(1658.5,1191.25) 1658.5,1229.37 1665.35,1236.22 1665.35,1253.67 C1.2 ; v1(1990,1254.75) 1991.02,1253.73 R17.1 C10.2
  Top w24: v1(1366.25,265.5) 1393.58,292.83 C21.2 ; v1(1395.5,415.75) 1434.8,455.05 C17.2 ; C14.2 1443.93,755.25 v1(1527.25,755.25) ; v1(1920.5,1318.75) 1920.68,1318.93 R14.1
  Top w32: LSP2.MP 904.04,1308.82 C4.2 ; U7.5@1187.45,1137.53 U7.5 1255.64,1137.53 1341.18,1223.07 C9.2 ; v1(1396,567.25) 1413.45,584.7 C18.2 ; v1(1414,109.75) 1419.88,115.63 C20.2
  Top w40: LSP2.MP 1026.62,1242.63 1131.72,1137.53 U7.5@1187.45,1137.53
  Bottom w16: v1(2143.25,685) 2212.23,685 C6.2
  Bottom w24: C5.2 1633.46,726.95 v1(1652.11,745.6)
  Bottom w40: LSP2.MP 841.38,1239.1 1269.61,1239.1 C7.-
  other v1: 1062.99,118.11 1889,137.5 2086.25,217 1198.5,248.25 1574.8,393.7 1614.17,393.7 2053.75,483.5 1205.9,548.03 1914,588.75 1811.02,590.55 1023.62,629.92 1811.02,629.92 1023.62,669.29 1811.02,669.29 1915.25,671.25 1670.25,673.5 1741.25,743.5 1889.76,787.4 1692.91,826.77 2125.98,826.77 1205.65,857.03 2125.98,866.14 1342.75,878 2125.98,905.51 1027,908.25 1027,938.5 1027,977.87 1625.88,997.87 2244.09,1023.62 1530.13,1025.62 1338.58,1102.36 1377.95,1102.36 1338.58,1141.73 1377.95,1141.73 1417.32,1141.73 1732.28,1141.73 1027,1174.72 1062.99,1181.1 1102.36,1181.1 1692.91,1181.1 1732.28,1181.1 1771.65,1181.1 1062.99,1220.47 1102.36,1220.47 1141.73,1220.47 1181.1,1220.47 1102.36,1259.84 1732.28,1259.84 1918.75,1274 905.51,1299.21 944.88,1299.21 1102.36,1299.21 1968.5,1299.21 1869.75,1358 1535.5,1390.25 1869.75,1397.5
LED_PIN: IC1.76 LED1.A | length 252.7
  Top w12: IC1.76 2137.22,1275.16 LED1.A
MEGA_MISO: IC1.22 J3.1 | length 715
  Top w10: IC1.22 1586.2,539 1643.5,539 1712.5,470 v1(1715,470)
  Bottom w16: J3.1 1601.38,98.62 1568,134 1568,227 1589,248 1719,247 1737,265 1737,448 v1(1715,470)
MEGA_MOSI: IC1.21 J3.4 | length 540.8
  Top w10: IC1.21 1586.56,558 1664,558 v1(1678.75,543.25)
  Bottom w16: J3.4 1517.85,214.85 1569,266 1569,333 1594,358 1646,358 1678.75,390.75 v1(1678.75,543.25)
MEGA_RST: C27.2 IC1.30 J3.5 R3.1 | length 2082.9
  Top w10: 1743,348 1743,400.52 IC1.30
  Top w16: J3.5 1693.62,298.62 1743,348 ; v1(1787.75,159.25) 1797.97,149.03 R3.1
  Route2 w12: v1(1103.25,78.25) 1432,78.25 1464,110.25 1464,222.5 1491.5,250 1569.23,250 J3.5
  Route15 w16: J3.5 1648.38,298.62 v1(1787.75,159.25)
  Bottom w12: C27.2 980.96,823.48 926.25,768.77 926.25,206 1054,78.25 v1(1103.25,78.25)
MEGA_RXD: IC1.2 R13.1 | length 679
  Top w10: IC1.2@1585.57,933 IC1.2
  Top w12: v1(1518,958.75) 1543.75,933 IC1.2@1585.57,933
  Route2 w12: v1(1026.25,1114.25) 1285,1114.25 1440.5,958.75 v1(1518,958.75)
  Bottom w12: R13.1 1024.45,1112.45 v1(1026.25,1114.25)
MEGA_SCK: IC1.20 J3.3 | length 674.5
  Top w10: IC1.20 1586.24,578 v1(1733,578)
  Bottom w16: J3.3 1742.62,198.62 1766,222 1766,545 v1(1733,578)
MEGA_TXD: IC1.3 R15.1 | length 731
  Top w10: IC1.3@1585.89,913 IC1.3
  Top w12: v1(1521.5,913.25) 1585.64,913.25 IC1.3@1585.89,913
  Route2 w12: v1(1006,1038.5) 1046.25,1078.75 1290.25,1078.75 1455.75,913.25 v1(1521.5,913.25)
  Bottom w12: R15.1 981.32,1013.82 v1(1006,1038.5)
MOTOR1_CLOSE: IC1.6 U2.13 | length 434.7
  Top w10: U2.13 1243.46,949.21 1259,964.75 1437.75,964.75 1468,934.5 1468,895.75 1509.95,853.8 IC1.6
MOTOR1_OPEN: IC1.5 U2.14 | length 468
  Top w10: U2.14 1218.46,952.96 1247.25,981.75 1450.25,981.75 1488.5,943.5 1488.5,904.5 1519.52,873.48 IC1.5
MOTOR1_SENSE: IC1.97 J4.19 | length 735.5
  Top w10: IC1.97 IC1.97@1724,1031.13
  Top w12: v1(1696.75,1125.75) 1724,1097.59 IC1.97@1724,1031.13
  Route15 w10: v1(1313.25,1014.5) 1367.5,1068.75 1639.75,1068.75 v1(1696.75,1125.75)
  Bottom w10: J4.19 1185.23,942.98 1251.75,1009.5 1308.25,1009.5 v1(1313.25,1014.5)
MOTOR2_CLOSE: IC1.15 U2.8 | length 400
  Top w10: U2.8 1243.46,758.79 1280.25,722 1489.25,722 1533.87,677.38 1585.29,677.38 IC1.15
MOTOR2_OPEN: IC1.7 U2.7 | length 474
  Top w10: v1(1214,741.25) 1218.46,745.71 U2.7 ; v1(1528.25,814.75) 1528.25,815.33 1546.9,833.99 1585.92,833.99 IC1.7
  Route15 w10: v1(1214,741.25) 1214,776 1231.5,793.5 1507,793.5 v1(1528.25,814.75)
MOTOR2_SENSE: IC1.96 J4.16 | length 780.9
  Top w10: v1(1718.15,946.4) 1743.52,971.77 IC1.96
  Route2 w10: v1(1290.25,754.25) 1450.75,754.25 1481,784.5 1558,784.5 1719.03,945.53 v1(1718.15,946.4)
  Bottom w10: J4.16 1181.38,824.87 1252,754.25 v1(1290.25,754.25)
MOTOR3_CLOSE: IC1.17 U3.13 | length 363.4
  Top w10: U3.13 1244.21,637.67 1252.8,646.26 1508.29,646.26 1517.29,637.26 IC1.17
MOTOR3_OPEN: IC1.16 U3.14 | length 398.9
  Top w10: U3.14 1219.21,645.71 1236.69,663.19 1515.54,663.19 1521.79,656.94 IC1.16
MOTOR3_SENSE: IC1.95 J4.13 | length 1059
  Top w10: IC1.95 IC1.95@1763,1030.76 ; v1(1763.25,949.25) 1763,949.5 IC1.95@1763,1030.76 ; v1(1788,1148) 1762,1122 IC1.95@1763,1030.76
  Route2 w10: v1(1078.75,706.75) 1087,715 1528.75,715 1763,949.25 v1(1763.25,949.25)
  Bottom w10: v1(1078.75,706.75) J4.13
MOTOR4_CLOSE: IC1.23 U3.8 | length 434.2
  Top w10: U3.8 1244.21,442.29 1279.75,406.75 1329,406.75 v1(1329.5,407.25) ; v1(1518.5,514.25) 1523.4,519.15 IC1.23
  Route2 w10: v1(1329.5,407.25) 1407,484.75 1489,484.75 v1(1518.5,514.25)
MOTOR4_OPEN: IC1.18 U3.7 | length 496.7
  Top w10: U3.7 1219.21,429.54 v1(1229,419.75) ; v1(1513.75,608.5) 1522.82,617.57 IC1.18
  Route2 w10: v1(1229,419.75) 1290.75,419.75 1479.5,608.5 v1(1513.75,608.5)
MOTOR4_SENSE: IC1.94 J4.10 | length 950.2
  Top w10: IC1.94 1783,1026.85 1783,974.5 1792.25,965.25 1792.25,934.75 1783.25,925.75 v1(1783.25,909.75)
  Route2 w10: v2(1266.5,689.02) 1635.77,689.02 1783.25,836.5 v1(1783.25,909.75)
  Bottom w10: J4.10 1174.9,588.65 1266.5,680.25 v2(1266.5,689.02)
MOTOR5_CLOSE: IC1.25 U4.13 | length 436.6
  Top w10: U4.13 1230.71,350.96 1246.25,366.5 1454.5,366.5 1567.78,479.78 IC1.25
MOTOR5_OPEN: IC1.24 U4.14 | length 470.3
  Top w10: U4.14 1205.71,351.96 1235.58,381.83 1437.43,381.83 1555.07,499.46 IC1.24
MOTOR5_SENSE: IC1.93 J4.7 | length 1309
  Top w10: IC1.93 1802.57,1099.32 1820.25,1117 v1(1845,1117)
  Route15 w10: v1(1281.5,450.75) 1500.5,450.75 1864.5,814.75 1864.5,1097.5 v1(1845,1117)
  Bottom w10: J4.7 1261.71,470.54 v1(1281.5,450.75)
MOTOR6_CLOSE: IC1.1 U4.8 | length 1700.1
  Top w10: U4.8 1230.71,145.54 1270,106.25 v1(1348.25,106.25)
  Top w12: IC1.1 1628.03,952.22 v1(1721.25,859)
  Bottom w10: v1(1348.25,106.25) 1412.25,42.25 1754.5,42.25 1877.25,165 1877.25,703 v1(1721.25,859)
MOTOR6_OPEN: IC1.26 U4.7 | length 845.1
  Top w10: U4.7 1205.71,134.79 1261.75,78.75 1438,78.75 1466.25,107 1466.25,334 1581.25,449 1648.25,449 1664.74,432.51 1664.74,401.08 IC1.26
MOTOR6_SENSE: IC1.92 J4.4 | length 1158.1
  Top w10: v1(1822,917) 1822,1030.7 IC1.92
  Route2 w10: v1(1272,324.25) 1412.75,324.25 1822.26,733.76 1822.26,916.74 v1(1822,917)
  Bottom w10: J4.4 1243.82,352.43 v1(1272,324.25)
MUSCLE_SENSE1: IC1.91 R7.1 | length 999.8
  Top w12: IC1.91 1841.94,957.06 1874,925 1931,925 v1(1952,904) ; v1(2039,283) 2044.18,277.82 R7.1
  Route15 w16: v1(1952,904) 1952,370.59 v1(2039,283)
MUSCLE_SENSE2: IC1.90 R11.1 | length 1079.3
  Top w12: IC1.90 1861.63,970.37 1879,953 1977,953 v1(1996,934) ; v1(2099,321) 2206.36,213.64 R11.1
  Route15 w16: v1(1996,934) 1996,436.88 v1(2099,321)
N$1: 
N$2: LED1.C R17.2 | length 78.8
  Top w24: R17.2 2057.95,1278.57 LED1.C
N$3: IC1.34 Y1.1 | length 204.8
  Top w12: IC1.34 1822.26,379.32 ccw(c1872.49,379.32) 1836.97,343.8 ccw(c1868.5,375.34) 1868.51,330.74 cw(c1868.51,274.03) 1925.22,274.03 Y1.1
N$4: LED2.C R14.2 | length 71.9
  Top w24: R14.2 2059.14,1364.16 LED2.C
N$5: IC1.33 Y1.3 | length 154
  Top w12: IC1.33 1802.57,365.41 ccw(c1848.41,365.42) 1816,333 cw(c1780.43,297.43) 1830.73,297.43 Y1.3
N$8: C16.2 U2.9 | length 97.6
  Top w16: U2.9 1336.09,763.55 C16.2
N$11: LSP4.MP R10.2 R11.2 R12.2 | length 2455
  Top w16: R12.2 2124.91,80.91 2169.75,80.91 ; v1(2167.5,48.25) 2167.5,78.66 2169.75,80.91 ; R11.2 2170.25,81.41 2169.75,80.91
  Route2 w16: LSP4.MP 889.96,333.79 923.75,300 923.75,162.25 1058,28 2147.25,28 v1(2167.5,48.25)
  Bottom w16: R10.2 2003.54,690.46 2016,678 2083.5,678 2113.75,647.75 2113.75,359.75 2167.5,306 v1(2167.5,48.25)
N$16: C27.1 LSP9.MP | length 84.9
  Bottom w24: LSP9.MP 892.89,853.13 C27.1
N$17: LSP3.MP R7.2 R8.2 R9.2 | length 2047.2
  Top w12: R7.2@2044.04,81.05 R7.2
  Top w16: v1(1923.25,81.25) 1962.38,81.25 R8.2 R7.2@2044.04,81.05
  Route15 w16: LSP3.MP 874.63,463.62 927,411.25 927,186.75 1074,39.75 1881.75,39.75 v1(1923.25,81.25)
  Bottom w16: v1(1923.25,81.25) 1923.54,81.54 1923.54,130.96 1924.23,485.45 R9.2
N$18: LSP7.MP R13.2 | length 78.4
  Bottom w24: LSP7.MP 915.81,1112.79 R13.2
N$19: LSP8.MP R15.2 | length 76.6
  Bottom w24: LSP8.MP 914.22,982.96 R15.2
N$38: R4.2 U2.15 | length 81.9
  Top w16: U2.15 1192.46,962.71 1200.57,970.82 R4.2
N$42: C15.1 U2.12 | length 76.8
  Top w16: U2.12 1311.87,895.18 C15.1
N$43: C19.2 U3.9 | length 97.5
  Top w16: U3.9 1336.69,454.94 C19.2@1355.7,454.94
N$44: C18.1 U3.12 | length 72.9
  Top w16: U3.12 1313.21,586.42 1331.58,604.79 C18.1
N$45: R5.2 U3.15 | length 73.8
  Top w16: U3.15 1194.18,624.38 R5.2
N$47: C21.1 U4.12 | length 72.2
  Top w16: U4.12 1294.72,286.04 C21.1
N$49: C22.2 U4.9 | length 95.2
  Top w16: U4.9 1322.43,155.32 C22.2
N$51: R6.2 U4.15 | length 75.6
  Top w16: R6.2 1179.71,395.07 U4.15
PALM_LED: IC1.13 LED2.A | length 1128.7
  Top w12: IC1.13 1667,716 1791.75,840.75 1990.25,840.75 v1(2030.25,880.75) ; LED2.A 2185.37,1363.88 2216.25,1333 v1(2216.25,1318)
  Bottom w12: v1(2030.25,880.75) 2216.25,1066.75 v1(2216.25,1318)
RX_BREAKOUT: IC1.45
RXD3: IC1.63 R9.1 | length 258.3
  Top w10: v1(2071,633.75) 2071,651 2136,716 IC1.63
  Bottom w16: R9.1 2070.46,633.21 v1(2071,633.75)
SCL: IC1.43 R8.1 | length 268.6
  Top w12: R8.1 1962.58,165.72 1999.75,202.89 1999.75,400.71 IC1.43
SDA: IC1.44 R12.1 | length 297.4
  Top w10: 2019,354 2019,350 2124.77,244.23 R12.1
  Top w12: 2019,354 2019,401.15 IC1.44
TX_BREAKOUT: IC1.46
TXD3: IC1.64 R10.1 | length 160.1
  Top w10: v1(2134,753) 2151.32,735.68 IC1.64
  Bottom w16: R10.1 2095.38,735 2113.38,753 v1(2134,753)
VCC: C1.1 C3.1 C5.1 C6.1 C8.1 C9.1 C10.1 IC1.10 IC1.31 IC1.61 IC1.80 IC1.100 J1.P$2 J3.2 J4.20 LSP5.MP LSP10.MP R3.2 R4.1 R5.1 R6.1 TP1.TP U7.3 | length 5375.9
  Top w10: J3.2 J3.2@1517.85,99.85 ; IC1.10@1585.98,775 IC1.10 ; IC1.100@1664.74,1031 IC1.100 IC1.100@1665,1031.18 ; C8.1@1763.39,290 C8.1 1763.2,289.66 IC1.31 1763.2,490.7 v1(1799.5,527) ; IC1.80@2058,1031.44 IC1.80 2058.48,798.64 2035,775.16 2035,626 2060,601 2117,601 v1(2149,633) ; IC1.61@2215.33,676 IC1.61
  Top w12: C3.1@1562.98,1143.02 C3.1 ; IC1.10@1586.57,775.59 IC1.10 1633.32,775.06 v1(1649.61,791.34) ; v1(1587.63,1109.38) 1588.94,1110.69 1628.81,1110.69 1664.78,1074.72 IC1.100 ; C10.1 2058.48,1122.78 IC1.80 ; v1(2149,633) 2149,650.25 2175.38,676.63 IC1.61
  Top w16: LSP10.MP 853.81,739.25 v1(992.5,739.25) ; R6.1 996.13,397.62 960.75,433 960.75,707.5 v1(992.5,739.25) ; R5.1 1127.25,725.25 1113.25,739.25 v1(992.5,739.25) ; J3.2@1517.85,99.85 1564,146 1661,146 1710,195 ; R3.2 1710,120.62 1710,195 ; C8.1@1763.39,290 1740,290 1710,260 1710,195 ; J1.P$2 1817.13,1303.37 v1(1827.25,1293.25)
  Top w20: LSP5.MP TP1.TP TP1.TP ; C3.1 1562.98,1134.03 v1(1587.63,1109.38) ; C10.1 2097.19,1123.31 v1(2098.5,1122)
  Top w24: v1(1077.75,1014.25) 1081.26,1010.74 R4.1
  Top w32: v1(1163.15,1283.79) 1171.25,1291.89 v1(1171.25,1313) ; U7.3 1171.31,1313.06 v1(1171.25,1313) ; C3.1 1542.8,1174.29 C1.1 1518.79,1289.99 C9.1 1373.94,1295 v1(1191.75,1295) 1173.75,1313 v1(1171.25,1313)
  Route15 w16: v1(1191.75,1295) 1193.5,1293.25 v1(1827.25,1293.25) 1998.5,1122 v1(2098.5,1122)
  Route15 w20: v1(1077.75,1014.25) 1077.75,1028 1246,1196.25 1246,1240.75 v1(1191.75,1295)
  Route15 w24: v1(1077.75,1014.25) 1078.75,1013.25 v1(1078.75,982.75)
  Bottom w16: C5.1 1587.63,794.89 v1(1587.63,1109.38) ; v1(2149,633) 2162.9,619.1 C6.1
  Bottom w24: v1(1078.75,982.75) 1079.15,982.35 J4.20 ; C5.1 1647.06,793.88 v1(1649.61,791.34)
pads on no net: IC1.4 IC1.8 IC1.9 IC1.12 IC1.14 IC1.19 IC1.27 IC1.28 IC1.29 IC1.35 IC1.36 IC1.37 IC1.38 IC1.39 IC1.40 IC1.41 IC1.42 IC1.47 IC1.48 IC1.49 IC1.50 IC1.51 IC1.52 IC1.53 IC1.54 IC1.55 IC1.56 IC1.57 IC1.58 IC1.59 IC1.60 IC1.65 IC1.66 IC1.67 IC1.68 IC1.69 IC1.70 IC1.71 IC1.72 IC1.73 IC1.74 IC1.75 IC1.79 IC1.82 IC1.83 IC1.84 IC1.85 IC1.86 IC1.87 IC1.98 U2.6 U3.6 U4.6 U7.2

## Polygon pours and split planes (outlines as drawn)
GND on Top "Polygon_1_Net_GND" (solid, remove dead copper, shelved, pour order 3): -583.74,-40.43 -583.74,1800.28 2398.7,1800.28 2398.7,-40.43
GND on Bottom "Polygon_2_Net_GND" (solid, remove dead copper, shelved, pour order 2): -316.02,-24.69 -316.02,1812.09 2418.39,1812.09 2418.39,-24.69
GND on Route2 "Polygon_3_Net_GND" (solid, remove dead copper, pour order 0): -405.7,-114.36 -405.7,1878.14 2492.32,1878.14 2492.32,-114.36
VCC on Route15 "Polygon_1_Net_VCC" (solid, remove dead copper, shelved, pour order 1): -500.13,-181.23 -500.13,1976.5 2445.01,1976.5 2445.01,-181.23

## Keep-outs
Keep-Out Layer:
  the board outline again, w3

## Silkscreen, mask and mechanical layers (free items; w line width, h text height)
Top Overlay:
  text "+6V" at 866.25,1390.5 h34
  text "+" at 1475.25,1312 h34
  text "Force Sen" at 1694.5,1294.75 h27.2
  text "GND" at 890.5,1220.75 h34
  text "Rxd" at 894.25,1096.75 h34
  text "Txd" at 891.25,967.25 h34
  text "Rst" at 893,837.25 h34
  text "VCC" at 898.25,701.5 h34
  text "GND" at 901.5,573.5 h34
  text "SCL/ADC6" at 758.25,513.25 h27.2
  text "SDA/ADC7" at 760.75,330.5 h27.2
  text "VCC" at 875.25,232.75 h27.2
  text "GND" at 915.25,86 h27.2
Dimension:
  the board outline again, w3
Reference:
  lines w0: -196.85,393.7 0,393.7 ; -196.85,1181.1 0,1181.1 ; -196.85,1574.8 0,1574.8 ; 393.7,-196.85 393.7,0 ; 787.4,-196.85 787.4,0 ; 1181.1,-196.85 1181.1,0 ; 1574.8,-196.85 1574.8,0 ; 1968.5,-196.85 1968.5,0 ; 2362.2,-196.85 2362.2,0
  lines w10: -492.13,1429.13 82.68,1429.13 86.61,1425.2 ; -283.46,232.28 59.06,232.28

## Dimensions
2283.46,1456.69 to 2283.46,0 on Dimension
2283.46,1456.69 to 748.03,1456.69 on Dimension
-488.19,1429.13 to -488.19,0 on tFinish
-15.75,889.76 to -15.75,0 on tFinish
-283.46,232.28 to -283.46,0 on tFinish
0,0 to 0,1771.65 on tFinish
2362.2,0 to 0,0 on tFinish

## Text inside footprints (layer, text, board x,y; h text height)
IC1: tDocu "R" at 2034.46,673.87 h20.4; tDocu "TQFP 100" at 1790.37,618.36 h27.2
J3: tPlace "1" at 1687.85,58.62 h34 r180
LED1: tDocu "C" at 2054.66,1277.24 h8.5 r90; tDocu "A" at 2157.02,1277.24 h8.5 r90
LED2: tDocu "C" at 2053.52,1359.94 h8.5 r90; tDocu "A" at 2155.88,1359.94 h8.5 r90
TP1: Top 3D Body ">TP_SIGNAL_NAME" at 939.25,129.03 h33.46
TP2: Top 3D Body ">TP_SIGNAL_NAME" at 873.62,56.3 h33.46
U2: tPlace "*" at 1064.46,898.18 h42.5; tDocu "*" at 1064.46,898.18 h42.5
U3: tPlace "*" at 1065.21,589.42 h42.5; tDocu "*" at 1065.21,589.42 h42.5
U4: tPlace "*" at 1051.71,289.04 h42.5; tDocu "*" at 1051.71,289.04 h42.5